# Altium PCB BLDC-Board.PcbDoc (part 7 of 7)
Units mm, origin at the board's own origin, x right, y up, seen from the top; angles counter-clockwise.
Board outline 150 x 117 mm, 4 copper layers (Top Layer, Layer 1, Layer 2, Bottom Layer), stack 1.566 mm thick; 307 components, 221 nets, 983 pads, 534 vias.
Unrouted connection lines stored in the file: 337.
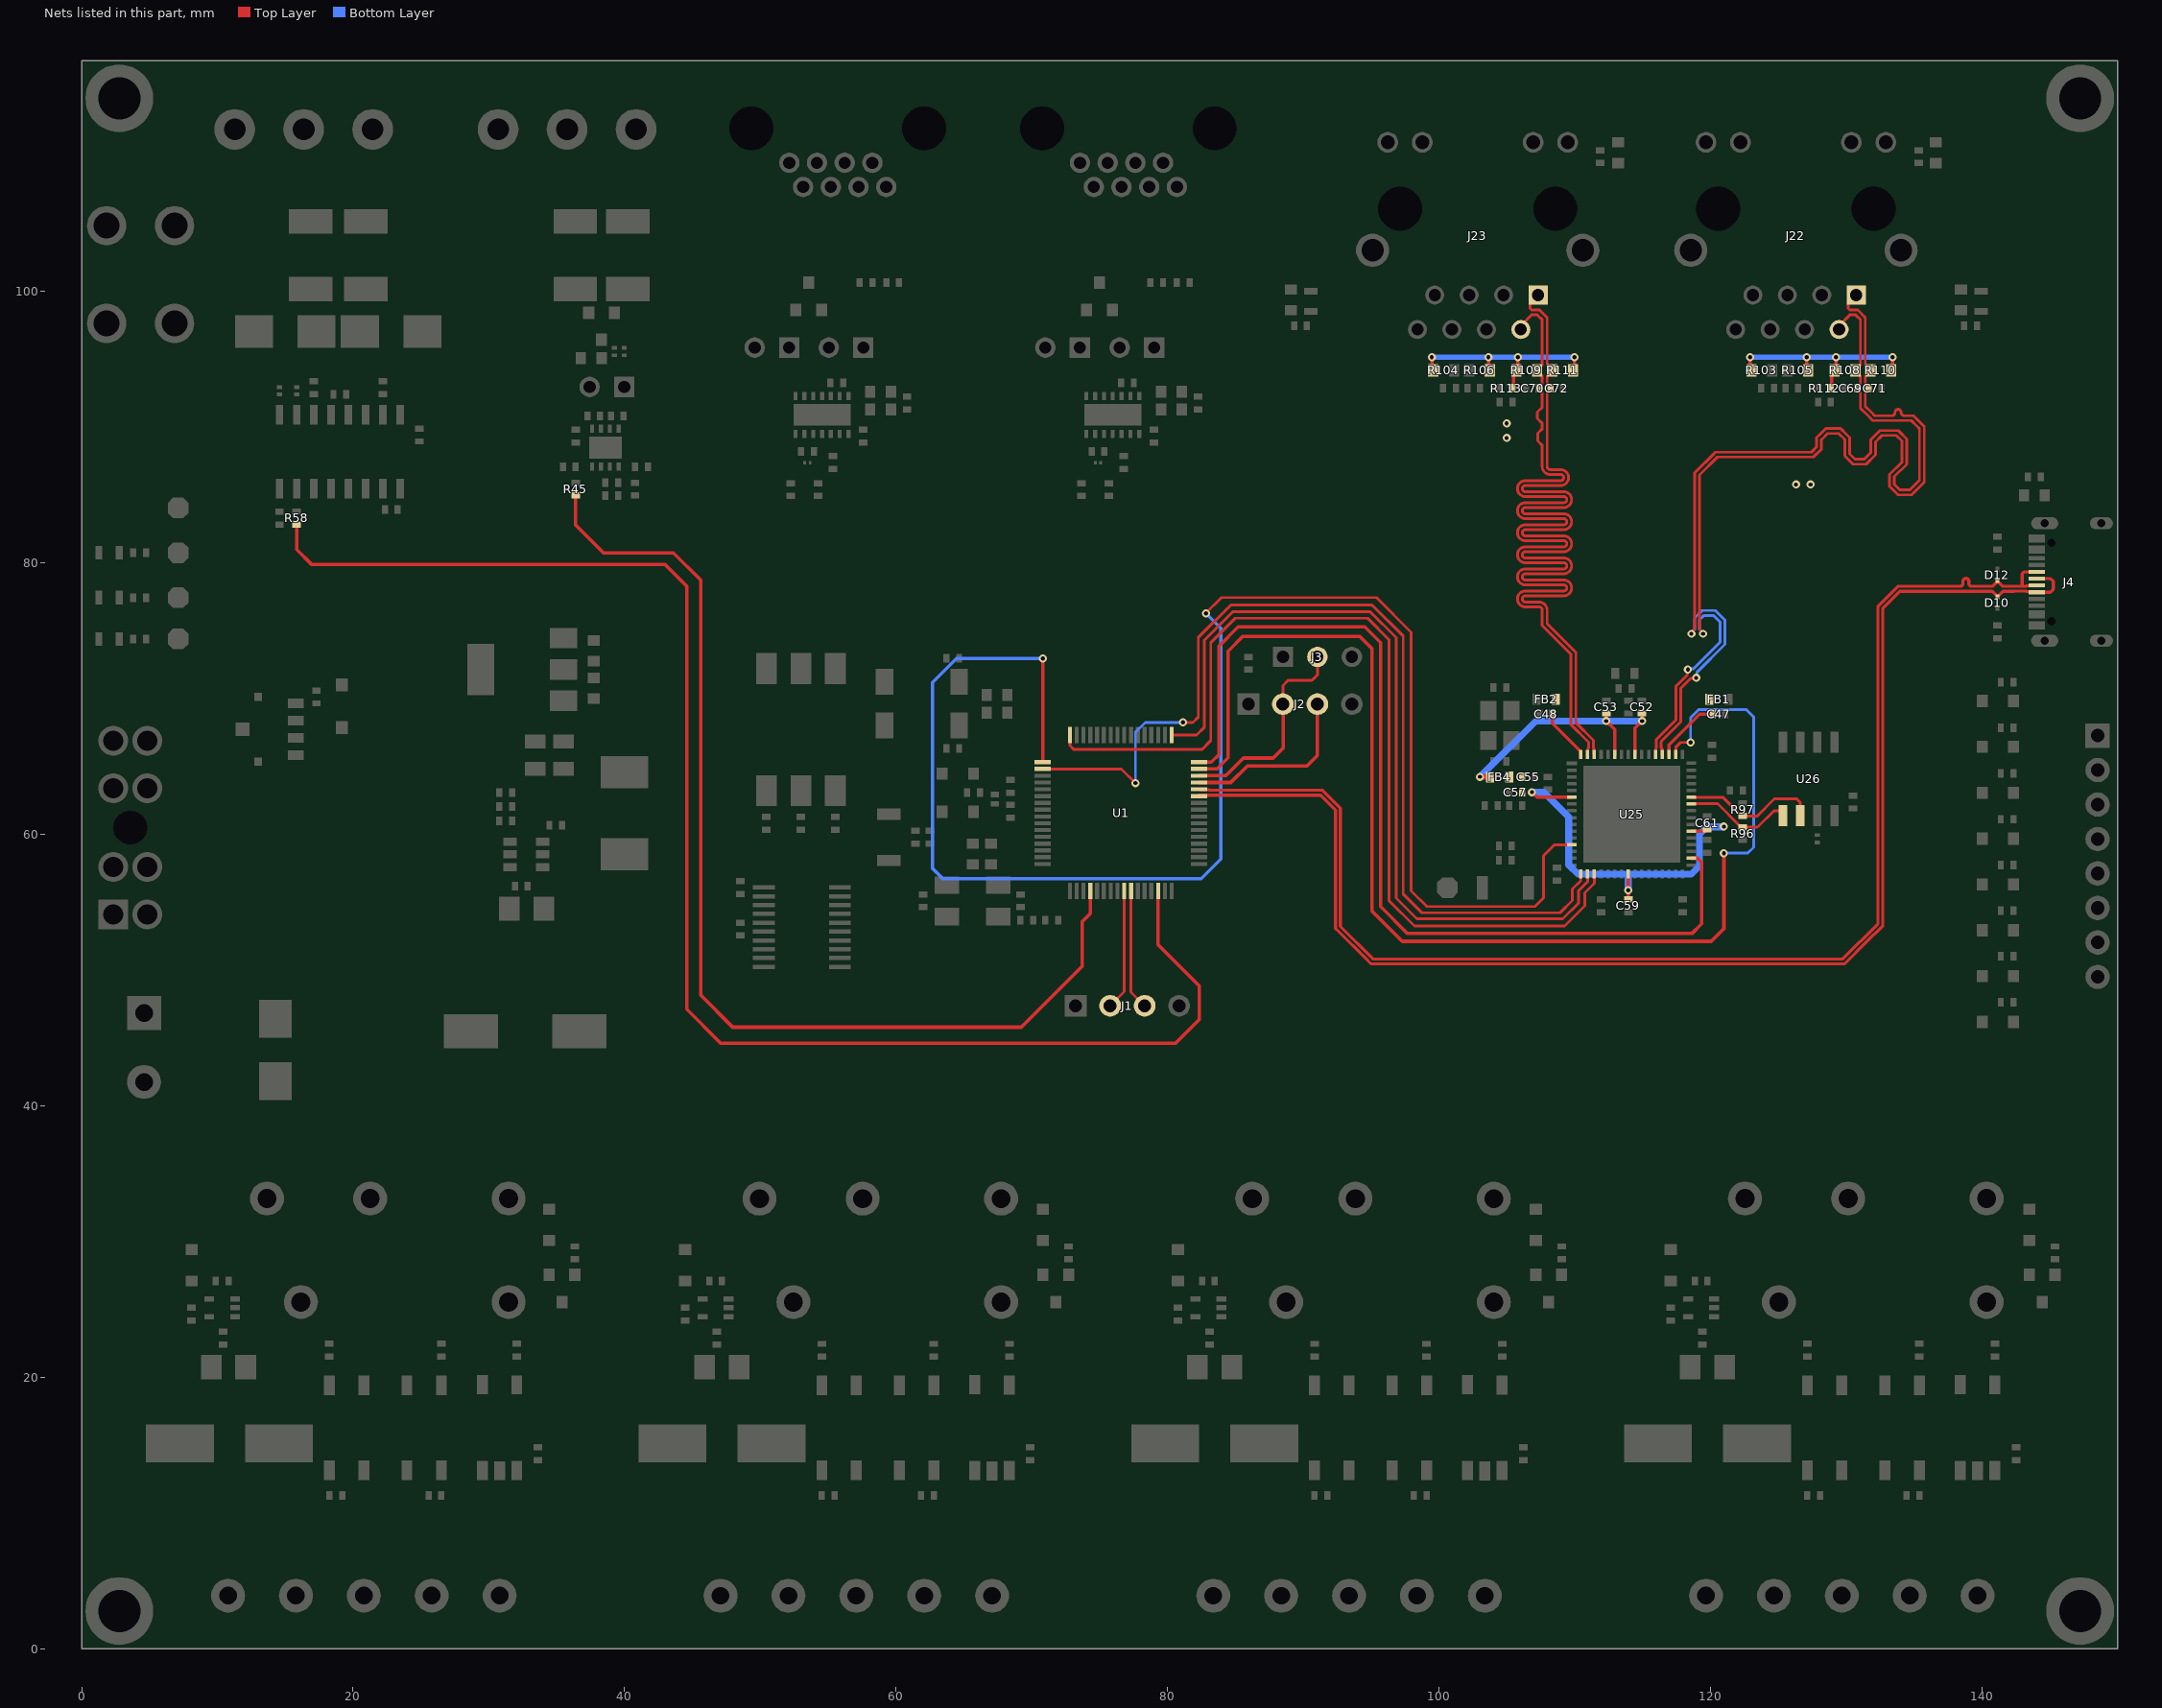
[diagram p6: the nets of this part, all layers, seen from the top]

## Via types
v1: diameter 0.6, hole 0.3, Top Layer to Bottom Layer, 534 vias

## Nets (pads, with @x,y where several pads share a name; then routed paths per layer and width w, separated by ;. In a path a pad name is that pad's centre, name@x,y a point inside that pad or via, vN(x,y) a via of type N, cw(c..) or ccw(c..) an arc to the next point about the centre after c; other vN are vias at no path point) (continued)
SCL: R97.1 U25.43 U26.6 | length 10.2
  Top Layer w0.203: U25.43@118.585,62.731 120.895,62.731 122.147,61.478 122.238,61.478 R97.1@122.365,61.351 123.452,61.351 124.703,62.602 126.341,62.602 126.594,62.35 U26.6@126.594,61.378
SDA: R96.1 U25.42 U26.5 | length 8.3
  Top Layer w0.203: U25.42@118.585,62.231 118.606,62.252 120.522,62.252 122.121,60.652 122.238,60.652 R96.1@122.365,60.525 ; R96.1@122.276,60.525 123.457,60.525 124.671,61.739 125.115,61.739 125.324,61.531 U26.5@125.324,61.378
SPI3_CS: U1.47 U25.50 | length 94.6
  Top Layer w0.203: U25.50@117.435,65.881 117.435,66.417 117.784,66.766 v1(118.528,66.766)
  Top Layer w0.254: U1.47@82.306,64.813 83.635,64.813 84.451,65.629 84.451,73.49 85.551,74.59 94.129,74.59 95.048,73.671 95.048,54.347 97.279,52.117 120.047,52.117 120.98,53.05 v1(120.98,58.606)
  Bottom Layer w0.203: v1(118.528,66.766) 118.528,68.586 119.125,69.183 122.623,69.183 123.165,68.641 123.165,59.052 122.718,58.606 v1(120.98,58.606)
SPI3_MISO: U1.1 U25.13 | length 122.6
  Top Layer w0.203: v1(82.819,76.281) 83.973,77.435 95.39,77.435 97.943,74.882 97.943,55.83 99.093,54.68 107.063,54.68 107.696,55.312 107.696,58.419 108.508,59.231 U25.13@109.785,59.231
  Top Layer w0.254: U1.1@70.815,65.323 v1(70.815,72.942)
  Bottom Layer w0.254: v1(70.815,72.942) 64.44,72.942 62.687,71.189 62.687,57.486 63.436,56.737 82.474,56.737 83.922,58.185 83.922,75.179 v1(82.819,76.281)
SPI3_MOSI: U1.2 U25.17 | length 73.6
  Top Layer w0.203: U1.2@70.806,64.813 76.59,64.813 v1(77.63,63.773) ; v1(81.128,68.243) 81.866,68.243 82.26,68.637 82.26,74.5 84.663,76.903 95.062,76.903 97.353,74.611 97.353,55.595 98.732,54.217 108.908,54.217 109.809,55.118 109.809,55.957 110.429,56.578 110.429,57.075 U25.17@110.435,57.081
  Bottom Layer w0.203: v1(77.63,63.773) 77.63,67.515 78.359,68.243 v1(81.128,68.243)
SPI3_SCK: U1.64 U25.19 | length 71
  Top Layer w0.203: U1.64@72.806,67.313 72.806,66.537 73.102,66.241 82.517,66.241 83.185,66.909 83.185,74.117 84.986,75.917 94.739,75.917 96.321,74.335 96.321,55.099 98.179,53.241 109.239,53.241 110.734,54.735 110.734,55.689 111.435,56.39 U25.19@111.435,57.081
SW_CLK/BOOT0: J2.2 J3.2 U1.46 | length 15.9
  Top Layer w0.203: J2.2@88.494,69.589 88.494,70.961 88.875,71.342 90.634,71.342 91.034,71.742 J3.2@91.034,73.069
  Top Layer w0.254: U1.46@82.306,64.313 84.282,64.313 85.583,65.614 87.777,65.614 88.519,66.357 88.519,69.564 J2.2@88.494,69.589
SW_DIO: J2.3 U1.45 | length 13.3
  Top Layer w0.254: U1.45@82.306,63.813 84.653,63.813 85.86,65.019 90.253,65.019 91.034,65.8 J2.3@91.034,69.589
SYNC0: U1.48 U25.34 | length 72.3
  Top Layer w0.254: U1.48@82.306,65.313 83.227,65.313 83.795,65.881 83.795,73.88 85.2,75.285 94.523,75.285 95.687,74.121 95.687,54.671 97.674,52.685 118.621,52.685 119.343,53.406 119.343,57.93 119.041,58.231 U25.34@118.585,58.231
SYNC1: U1.49 U25.18 | length 61
  Top Layer w0.203: U1.49@80.306,67.313 82.127,67.313 82.717,67.902 82.717,74.311 84.804,76.398 94.92,76.398 96.84,74.479 96.84,55.292 98.364,53.767 109.104,53.767 110.265,54.929 110.265,55.844 110.935,56.513 U25.18@110.935,57.081
TXA_N: C69.2 J22.2 R108.1 U25.52 | length 72.9
  Top Layer w0.203: U25.52@116.435,65.881 116.412,65.904 116.412,66.31 116.363,66.359 116.363,66.831 117.813,68.281 117.813,70.758 118.531,71.476 118.883,71.476 v1(118.935,71.528) ; v1(118.583,74.771) 118.583,74.878 118.833,75.128 118.833,86.628 119.041,86.836 120.146,87.942 120.354,88.15 127.431,88.15 127.815,88.534 127.815,89.225 128.041,89.451 128.477,89.887 129.584,89.887 130.026,89.445 130.234,89.237 130.234,88.018 130.627,87.625 131.318,87.625 131.801,88.108 131.801,89.066 132.478,89.743 133.828,89.743 133.932,89.639 134.442,89.129 134.442,87.258 133.539,86.356 133.539,85.783 133.96,85.363 134.666,85.363 135.385,86.082 135.385,89.883 135.194,90.075 134.789,90.48 131.944,90.48 131.613,90.811 131.039,91.385 131.039,92.526 130.797,92.767 C69.2@130.797,92.856 130.797,92.945 131.039,93.186 131.039,93.732 130.658,94.113 R108.1@130.658,94.177 130.658,94.24 131.039,94.621 131.039,97.911 130.686,98.264 130.256,98.264 129.464,97.473 J22.2@129.464,97.188
  Bottom Layer w0.203: v1(118.583,74.771) 118.583,74.844 118.833,75.093 118.833,75.941 119.041,76.149 119.166,76.274 119.374,76.482 120.354,76.482 120.562,76.274 120.848,75.988 121.056,75.78 121.056,74.001 118.987,71.932 118.987,71.579 v1(118.935,71.528)
TXA_P: C71.2 J22.1 R110.1 U25.53 | length 72.9
  Top Layer w0.203: U25.53@115.935,65.881 115.958,65.904 115.958,66.31 116.007,66.359 116.007,66.978 117.457,68.428 117.457,70.905 118.279,71.727 118.279,72.08 v1(118.331,72.132) ; v1(119.437,74.771) 119.437,74.878 119.188,75.128 119.188,86.481 120.502,87.794 127.578,87.794 128.171,88.387 128.171,89.078 128.188,89.095 128.624,89.531 129.437,89.531 129.879,89.09 129.879,87.871 130.48,87.27 131.465,87.27 132.156,87.96 132.156,88.919 132.625,89.388 133.68,89.388 134.086,88.982 134.086,87.405 133.183,86.503 133.183,85.636 133.812,85.007 134.813,85.007 135.741,85.935 135.741,90.031 134.936,90.835 134.825,90.835 134.266,90.835 cw(c134.266,91.064) 134.038,91.064 134.038,91.073 ccw(c133.809,91.073) 133.58,91.073 133.58,91.064 cw(c133.352,91.064) 133.352,90.835 132.812,90.835 132.092,90.835 131.864,91.063 131.394,91.532 131.394,92.526 131.636,92.767 C71.2@131.636,92.856 131.636,92.945 131.394,93.186 131.394,93.732 131.775,94.113 R110.1@131.775,94.177 131.775,94.24 131.394,94.621 131.394,98.059 130.833,98.62 130.256,98.62 130.137,98.739 130.137,99.13 J22.1@130.734,99.728
  Bottom Layer w0.203: v1(118.331,72.132) 118.383,72.183 118.735,72.183 120.701,74.149 120.701,75.633 120.207,76.127 119.522,76.127 119.188,75.793 119.188,75.093 119.437,74.844 v1(119.437,74.771)
TXB_N: C70.2 J23.2 R109.1 U25.63 | length 75.6
  Top Layer w0.203: J23.2@106.025,97.188 106.025,97.473 106.816,98.264 107.244,98.264 107.599,97.909 107.599,94.621 107.218,94.24 R109.1@107.218,94.177 107.218,94.113 107.599,93.732 107.599,93.186 107.358,92.945 C70.2@107.358,92.856 107.358,92.767 107.599,92.526 107.599,91.462 107.226,91.09 107.226,90.646 107.599,90.274 107.599,89.885 107.26,89.546 107.26,88.985 107.599,88.646 107.599,88.316 107.599,87.09 ccw(c108.183,87.09) 108.183,86.506 108.954,86.506 cw(c108.954,86.278) 108.954,86.049 106.355,86.049 ccw(c106.355,85.465) 106.355,84.881 109.182,84.881 cw(c109.182,84.652) 109.182,84.423 106.355,84.423 ccw(c106.355,83.839) 106.355,83.255 109.182,83.255 cw(c109.182,83.026) 109.182,82.798 106.355,82.798 ccw(c106.355,82.214) 106.355,81.629 109.182,81.629 cw(c109.182,81.401) 109.182,81.172 106.355,81.172 ccw(c106.355,80.588) 106.355,80.004 109.182,80.004 cw(c109.182,79.775) 109.182,79.547 106.355,79.547 ccw(c106.355,78.962) 106.355,78.378 109.182,78.378 cw(c109.182,78.15) 109.182,77.921 106.355,77.921 ccw(c106.355,77.337) 106.355,76.753 107.37,76.753 cw(c107.37,76.524) 107.599,76.524 107.599,76.245 107.599,75.373 109.721,73.251 109.721,68.07 111.007,66.783 111.007,66.359 110.958,66.31 110.958,65.904 U25.63@110.935,65.881
TXB_P: C72.2 J23.1 R111.1 U25.62 | length 75.6
  Top Layer w0.203: J23.1@107.295,99.728 106.697,99.13 106.697,98.739 106.816,98.62 107.391,98.62 107.954,98.057 107.954,94.621 108.335,94.24 R111.1@108.335,94.177 108.335,94.113 107.954,93.732 107.954,93.186 108.196,92.945 C72.2@108.196,92.856 108.196,92.767 107.954,92.526 107.954,88.316 107.954,87.09 ccw(c108.183,87.09) 108.183,86.862 108.954,86.862 cw(c108.954,86.278) 108.954,85.693 106.355,85.693 ccw(c106.355,85.465) 106.355,85.236 109.182,85.236 cw(c109.182,84.652) 109.182,84.068 106.355,84.068 ccw(c106.355,83.839) 106.355,83.611 109.182,83.611 cw(c109.182,83.026) 109.182,82.442 106.355,82.442 ccw(c106.355,82.214) 106.355,81.985 109.182,81.985 cw(c109.182,81.401) 109.182,80.817 106.355,80.817 ccw(c106.355,80.588) 106.355,80.359 109.182,80.359 cw(c109.182,79.775) 109.182,79.191 106.355,79.191 ccw(c106.355,78.962) 106.355,78.734 109.182,78.734 cw(c109.182,78.15) 109.182,77.565 106.355,77.565 ccw(c106.355,77.337) 106.355,77.108 107.37,77.108 cw(c107.37,76.524) 107.954,76.524 107.954,76.245 107.954,75.52 110.076,73.398 110.076,68.217 111.363,66.93 111.363,66.359 111.412,66.31 111.412,65.904 U25.62@111.435,65.881
TXD/RS232: R58.2 U1.30 | length 113.1
  Top Layer w0.254: R58.2@15.847,82.823 15.847,80.974 16.957,79.864 42.987,79.864 44.574,78.277 44.574,47.111 47.079,44.606 80.581,44.606 82.347,46.372 82.347,48.812 79.306,51.853 U1.30@79.306,55.813
TXD/RS485: R45.1 U1.20 | length 80.4
  Top Layer w0.254: R45.1@36.395,84.956 36.395,82.78 38.447,80.728 43.6,80.728 45.622,78.706 45.622,48.129 47.964,45.787 69.219,45.787 73.705,50.274 73.705,53.569 74.306,54.17 U1.20@74.306,55.813
USART1_RX: J1.3 U1.26 | length 8.9
  Top Layer w0.203: U1.26@77.306,55.813 77.306,48.367 J1.3@78.308,47.364
USART1_TX: J1.2 U1.25 | length 8.9
  Top Layer w0.203: J1.2@75.768,47.364 76.806,48.402 U1.25@76.806,55.813
USB_N: D10.1 J4.A7 J4.B7 U1.43 | length 100.6
  Top Layer w0.229: U1.43@82.306,62.871 83.098,62.871 83.113,62.885 91.277,62.885 92.376,61.787 92.376,53.065 92.584,52.857 94.63,50.81 94.88,50.561 94.984,50.456 129.878,50.456 129.983,50.561 131.405,51.983 132.689,53.267 132.689,76.659 133.937,77.907 139.743,77.907 140.748,77.907 141.102,77.553 141.102,77.508 D10.1@141.122,77.487 ; D10.1@141.122,77.532 141.143,77.553 141.188,77.553 141.542,77.907 142.355,77.907 142.356,77.909 143.233,77.909 143.27,77.872 144.005,77.872 J4.B7@144.04,77.837 145.025,77.837 145.241,78.052 145.241,78.632 145.037,78.837 J4.A7@144.04,78.837
USB_P: D12.1 J4.A6 J4.B6 U1.44 | length 100.4
  Top Layer w0.229: U1.44@82.306,63.319 82.347,63.277 83.076,63.277 83.113,63.241 91.425,63.241 92.731,61.934 92.731,53.212 95.132,50.812 129.731,50.812 132.333,53.414 132.333,76.807 133.789,78.263 138.249,78.263 138.363,78.263 ccw(c138.363,78.491) 138.592,78.491 138.592,78.638 cw(c138.808,78.638) 139.023,78.638 139.023,78.491 ccw(c139.252,78.491) 139.252,78.263 139.891,78.263 140.282,78.263 140.748,78.263 141.102,78.617 141.102,78.662 D12.1@141.122,78.683 ; D12.1@141.122,78.638 141.143,78.617 141.188,78.617 141.542,78.263 142.207,78.263 142.209,78.264 142.943,78.264 ; J4.A6@144.04,78.337 144.005,78.301 143.27,78.301 143.233,78.264 142.943,78.264 ; J4.B6@144.04,79.337 143.104,79.337 142.943,79.175 142.943,78.264
VDD12TX1: C52.2 C53.2 FB4.2 U25.56 U25.59 | length 20.9
  Top Layer w0.254: C53.2@112.314,68.904 v1(112.314,68.343) 112.935,67.722 U25.59@112.935,65.881 ; U25.56@114.435,65.881 114.435,67.825 v1(114.952,68.343) C52.2@114.952,68.904
  Top Layer w0.381: v1(103.016,64.231) FB4.2@103.769,64.231
  Bottom Layer w0.508: v1(103.016,64.231) 107.128,68.343 v1(112.314,68.343) v1(114.952,68.343)
VDD33TXRX1: C47.2 FB1.2 R103.2 R105.2 R108.2 R110.2 R112.2 U25.51 | length 20.8
  Top Layer w0.254: U25.51@116.935,65.881 116.935,66.581 119.207,68.853 C47.2@120.138,68.853 ; v1(122.906,95.142) 122.906,94.283 R103.2@123.012,94.177 ; v1(127.072,95.142) 127.072,94.283 R105.2@127.178,94.177 ; R112.2@128.854,92.856 128.92,92.921 128.92,93.963 129.24,94.283 v1(129.24,95.142) ; R110.2@133.299,94.177 133.406,94.283 v1(133.406,95.142)
  Bottom Layer w0.381: v1(122.906,95.142) v1(127.072,95.142) v1(129.24,95.142) v1(133.406,95.142)
  other v1: 126.289,85.769 127.356,85.769
VDD33TXRX2: C48.2 FB2.2 R104.2 R106.2 R109.2 R111.2 R113.2 U25.64 | length 20.1
  Top Layer w0.254: v1(99.466,95.142) 99.466,94.283 R104.2@99.572,94.177 ; v1(103.632,95.142) 103.632,94.283 R106.2@103.739,94.177 ; R113.2@105.414,92.856 105.476,92.918 105.476,93.959 105.8,94.283 v1(105.8,95.142) ; C48.2@108.348,69.107 108.348,68.189 110.435,66.102 U25.64@110.435,65.881 ; R111.2@109.859,94.177 109.966,94.283 v1(109.966,95.142)
  Bottom Layer w0.381: v1(99.466,95.142) v1(103.632,95.142) v1(105.8,95.142) v1(109.966,95.142)
  other v1: 104.978,89.198 104.978,90.265
VDDCR: C55.2 C57.2 C59.2 C61.2 FB4.1 U25.6 U25.24 U25.38 | length 28.9
  Top Layer w0.254: v1(106.839,63.106) 107.214,62.731 U25.6@109.785,62.731 ; C59.2@113.935,55.204 v1(113.935,55.886) U25.24@113.935,57.081 ; U25.38@118.585,60.231 119.518,60.231 119.659,60.373 C61.2@119.748,60.373
  Bottom Layer w0.508: v1(106.839,63.106) 107.712,63.106 109.55,61.268 109.55,57.753 110.236,57.067 113.935,57.067 ; v1(113.935,55.886) 113.935,57.067 ; v1(120.98,60.567) 120.963,60.55 119.734,60.55 119.18,59.996 119.18,57.659 118.588,57.067 113.935,57.067
pads on no net: J4.A4/B9 J4.A8 J4.B4/A9 J4.B8 J4.MH J7. J12. J12.1 J12.2 J12.3 J12.6 J13. J13.1 J13.2 J13.3 J13.6 J22.7 J22.11 J22.12 J22.MH1 J22.MH2 J23.7 J23.11 J23.12 J23.MH1 J23.MH2 K1.5 K2.5 K3.5 K4.5 U2.3 U2.8 U2.13 U2.18 U8.11 U8.12 U8.13 U8.14 U25.3 U25.12 U25.15 U25.16 U25.21 U25.22 U25.23 U25.25 U25.26 U25.27 U25.28 U25.29 U25.30 U25.31 U25.33 U25.35 U25.36 U25.39 U25.40 U25.49

## Polygon pours and split planes (outlines as drawn)
+24V on Top Layer "+24V_L01_P016" (solid, pour order 16): 26.492,58.852 26.492,68.727 17.094,68.727 17.094,31.337 35.154,31.337 35.154,38.068 32.258,38.068 32.258,58.852
GND on Top Layer "GND_L01_P035" (solid, pour order 35): 146.412,10.719 146.412,27.814 143.759,30.467 117.205,30.467 115.771,29.034 115.771,19.903 117.151,18.523 119.748,18.523 119.748,22.638 127.317,22.638 127.317,16.776 127.317,10.719
GND on Top Layer "GND_L01_P034" (solid, pour order 34): 110.111,10.77 110.111,27.806 107.459,30.459 80.904,30.459 79.471,29.026 79.471,19.894 80.851,18.515 83.448,18.515 83.448,22.629 91.017,22.629 91.017,16.767 91.017,10.77
GND on Top Layer "GND_L01_P033" (solid, pour order 33): 73.815,10.719 73.815,27.806 71.162,30.459 44.608,30.459 43.174,29.026 43.174,19.894 44.554,18.515 47.151,18.515 47.151,22.629 54.72,22.629 54.72,16.767 54.72,10.719
GND on Top Layer "GND_L01_P032" (solid, pour order 32): 37.535,10.719 37.535,27.814 34.882,30.467 8.328,30.467 6.894,29.034 6.894,19.903 8.274,18.523 10.871,18.523 10.871,22.638 18.44,22.638 18.44,16.776 18.44,10.719
GND on Top Layer "GND_L01_P029" (solid, remove dead copper, pour order 29): 0,36.341 0,117 150,117 150,36.341
MOTOR4_PLUS on Top Layer "MOTOR4_PLUS_L01_P025" (solid, pour order 25): 118.617,16.54 118.617,12.046 121.882,8.782 121.882,1.848 117.233,1.848 117.233,8.426 111.849,13.811 111.849,31.76 114.728,34.639 124.295,34.639 124.295,31.566 116.903,31.566 115.405,30.067 115.405,19.752
MOTOR3_PLUS on Top Layer "MOTOR3_PLUS_L01_P024" (solid, pour order 24): 82.317,16.532 82.317,12.038 85.581,8.774 85.581,1.84 80.933,1.84 80.933,8.418 75.548,13.803 75.548,31.752 78.427,34.631 87.994,34.631 87.994,31.558 80.603,31.558 79.104,30.059 79.104,19.744
MOTOR1_PLUS on Top Layer "MOTOR1_PLUS_L01_P023" (solid, pour order 23): 9.74,16.54 9.74,12.046 13.005,8.782 13.005,1.848 8.357,1.848 8.357,8.426 2.972,13.811 2.972,31.76 5.851,34.639 15.418,34.639 15.418,31.566 8.026,31.566 6.528,30.067 6.528,19.752
MOTOR2_PLUS on Top Layer "MOTOR2_PLUS_L01_P022" (solid, pour order 22): 46.02,16.532 46.02,12.038 49.285,8.774 49.285,1.84 44.636,1.84 44.636,8.418 39.252,13.803 39.252,31.752 42.131,34.631 51.698,34.631 51.698,31.558 44.306,31.558 42.808,30.059 42.808,19.744
MOTOR3_GND on Top Layer "MOTOR3_GND_L01_P021" (solid, pour order 21): 83.898,12.108 86.369,9.637 86.369,1.84 90.179,1.84 90.179,9.409 89.617,9.971 89.617,16.532 87.883,18.265 87.883,21.626 83.898,21.626
MOTOR2_GND on Top Layer "MOTOR2_GND_L01_P019" (solid, pour order 19): 47.602,12.108 50.072,9.637 50.072,1.84 53.882,1.84 53.882,9.409 53.32,9.971 53.32,16.532 51.586,18.265 51.586,21.626 47.602,21.626
+24V on Top Layer "+24V_L01_P017" (solid, pour order 17): 29.642,41.573 39.573,41.573 144.221,41.573 144.221,31.439 126.594,31.439 126.594,35.839 108.052,35.839 108.052,31.439 90.627,31.439 90.627,35.839 71.907,35.839 71.907,31.362 54.204,31.362 54.204,35.839 41.79,35.839 37.287,31.337 29.642,31.337
MOTOR4_GND on Top Layer "MOTOR4_GND_L01_P012" (solid, pour order 12): 120.199,12.116 122.669,9.645 122.669,1.848 126.479,1.848 126.479,9.417 125.917,9.979 125.917,16.54 124.183,18.273 124.183,21.634 120.199,21.634
MOTOR1_GND on Top Layer "MOTOR1_GND_L01_P009" (solid, pour order 9): 11.322,12.116 13.792,9.645 13.792,1.848 17.602,1.848 17.602,9.417 17.04,9.979 17.04,16.54 15.307,18.273 15.307,21.634 11.322,21.634
VDD33TXRX1 on Top Layer "VDD33TXRX1_L01_P003" (solid, pour order 3): 119.608,68.536 119.608,70.998 120.726,72.115 120.726,84.499 122.657,86.43 127.94,86.43 127.94,85.134 123.241,85.134 121.92,83.813 121.92,71.895 120.367,70.342 120.367,68.536
VDD33TXRX2 on Top Layer "VDD33TXRX2_L01_P002" (solid, pour order 2): 105.643,90.722 105.643,88.517 104.013,86.887 104.013,76.272 108.878,71.407 108.878,68.536 108.119,68.536 108.119,70.665 102.489,76.295 102.489,90.722
NetC16_1 on Top Layer "NETC16_1_L01_P001" (solid, pour order 1): 34.605,58.825 34.93,58.825 37.103,60.998 42.901,60.998 42.901,56.813 37.135,56.813 35.743,58.205 33.466,58.205 33.466,58.825
GND on Layer 1 "GND_L02_P031" (solid, pour order 31): 0,0 0,117 150,117 150,0
"CHASIS GND" on Layer 1 "CHASIS_GND_L02_P015" (solid, pour order 15): 116.865,95.98 123.393,95.98 123.393,101.162 141.326,101.162 141.326,9.95 0,9.95 0,0 150,0 150,117 0,117 0,105.816 92.939,105.816 92.939,95.98 112.624,95.98
+3V3 on Layer 2 "+3V3_L03_P028" (solid, pour order 28): 0,0 0,117 150,117 150,0
+5V on Layer 2 "+5V_L03_P027" (solid, pour order 27): 54.94,92.405 71.711,92.405 72.727,91.389 79.451,91.389 79.451,87.446 51.892,87.446 51.892,72.51 38.252,72.51 38.252,63.468 59.353,63.468 70.199,74.314 137.312,74.314 137.312,14.046 32.715,14.046 32.715,0 150,0 150,86.861 89.662,86.861 81.839,94.685 54.94,94.685
+24V on Layer 2 "+24V_L03_P008" (solid, pour order 8): 26.162,49.454 26.162,44.926 108.052,44.926 108.052,28.772 17.704,28.772 17.704,49.454
GND on Bottom Layer "GND_L04_P030" (solid, remove dead copper, pour order 30): 0,0 0,117 150,117 150,0

## Other copper
Top Layer:
  rectangle net GND: 2.622,40.022 8.718,43.899
  rectangle net +24V: 136.557,31.449 144.167,35.445
  rectangle net +24V: 126.853,31.481 134.463,35.476
  rectangle net +24V: 99.242,31.59 106.852,35.585
  rectangle net +24V: 91.21,31.59 98.82,35.585
  rectangle net +24V: 63.921,31.59 71.531,35.585
  rectangle net +24V: 54.644,31.59 62.254,35.585
  rectangle net +24V: 28.564,31.598 36.174,35.593
  rectangle net +24V: 18.364,31.598 25.974,35.593
  rectangle net NetJ7_3: 0.533,62.052 14.224,72.339
  rectangle net NetD13_2: 0.457,44.628 16.576,49.225
  rectangle net NetD29_1: 18.727,69.297 19.627,71.494
  rectangle net NetD29_1: 14.91,69.297 19.627,69.997
  rectangle net NetD13_2: 0.457,44.628 13.513,58.947
  rectangle net +24V: 14.884,50.368 25.857,68.727
  rectangle net GND: 71.605,60.161 72.439,61.463
  rectangle net GND: 67.844,61.163 72.439,61.463
  rectangle net MOTOR1_PLUS: 8.37,1.848 13.005,6.629
  rectangle net MOTOR2_PLUS: 44.649,1.84 49.285,6.621
  rectangle net MOTOR3_PLUS: 80.946,1.84 85.581,6.621
  rectangle net MOTOR4_PLUS: 117.246,1.848 121.882,6.629
  rectangle net GND: 32.584,27.086 34.842,29.032
  rectangle net GND: 105.279,27.078 107.537,29.024
  rectangle net GND: 68.957,27.078 71.215,29.024
  rectangle net GND: 138.111,15.988 143.862,17.577
  rectangle net GND: 141.395,14.509 143.862,17.577
  rectangle net GND: 32.496,14.509 34.963,15.583
  rectangle net GND: 68.747,14.501 71.214,15.575
  rectangle net GND: 105.094,14.501 107.561,15.575
  rectangle net GND: 6.894,19.899 10.747,22.638
  rectangle net GND: 7.633,19.431 10.747,22.638
  rectangle net GND: 8.732,18.523 10.747,22.638
  rectangle net GND: 43.25,19.899 47.103,22.638
  rectangle net GND: 43.989,19.431 47.103,22.638
  rectangle net GND: 45.088,18.523 47.103,22.638
  rectangle net GND: 79.547,19.899 83.399,22.638
  rectangle net GND: 80.286,19.431 83.399,22.638
  rectangle net GND: 81.385,18.523 83.399,22.638
  rectangle net GND: 117.685,18.523 119.7,22.638
  rectangle net GND: 116.586,19.431 119.7,22.638
  rectangle net GND: 115.847,19.899 119.7,22.638
  rectangle net MOTOR4_GND: 122.669,1.848 126.479,6.35
  rectangle net MOTOR3_GND: 86.369,1.84 90.179,6.342
  rectangle net MOTOR2_GND: 50.072,1.84 53.882,6.342
  rectangle net MOTOR1_GND: 13.792,1.848 17.602,6.35
  rectangle net +3V3: 107.696,63.063 109.124,63.735
  rectangle net +3V3: 48.066,53.253 51.139,53.729
  rectangle net GND: 141.581,27.086 143.884,29.029
  rectangle net +3V3: 32.487,73.603 41.402,77.286
  rectangle net +5V: 52.79,86.379 54.163,86.986
  rectangle net +5V: 74.209,86.379 75.577,86.982
  rectangle net +3V3: 116.741,23.035 118.721,24.656
  rectangle net +3V3: 80.441,23.035 82.421,24.656
  rectangle net +3V3: 44.144,23.035 46.124,24.656
  rectangle net +3V3: 7.788,23.035 9.768,24.656
  rectangle net MOTOR4_PLUS: 118.989,31.566 124.295,34.639
  rectangle net MOTOR3_PLUS: 82.688,31.558 87.994,34.631
  rectangle net MOTOR2_PLUS: 46.392,31.558 51.698,34.631
  rectangle net MOTOR1_PLUS: 10.112,31.566 15.418,34.639
  rectangle net +3V3: 34.083,89.584 37.762,90.184
  rectangle net +3V3: 119.774,64.751 120.409,65.868
  rectangle net VDD33TXRX1: 119.608,68.536 120.367,70.342
  rectangle net VDD33TXRX2: 108.119,68.536 108.878,70.342
  rectangle net VDD33TXRX2: 110.211,65.531 110.56,66.309
  rectangle net +3V3: 105.88,61.789 106.849,62.536
  rectangle net VDDCR: 105.804,62.789 107.151,63.424
  rectangle net VDDCR: 105.804,62.789 106.337,64.631
  rectangle net VDDCR: 120.648,60.144 121.285,60.877
  rectangle net VDDCR: 119.431,60.144 121.285,60.601
  rectangle net RE/DE/RS485/T: 38.113,86.784 39.063,87.384
  rectangle net +5V: 76.458,91.997 76.758,93.58
  rectangle net +3V3: 48.066,53.253 48.994,55.84
  rectangle net +5V: 75.12,87.89 75.458,89.797
  rectangle net +5V: 74.979,86.379 75.577,88.525
  rectangle net +5V: 53.565,86.379 54.163,88.525
  rectangle net +5V: 53.706,87.89 54.044,89.797
  rectangle net +5V: 55.044,91.997 55.344,93.58
  rectangle net VDDCR: 104.869,63.831 106.337,64.631
  rectangle net +5V: 31.66,11.804 33.964,14.133
  rectangle net +5V: 67.94,11.796 70.244,14.125
  rectangle net +5V: 104.237,11.796 106.54,14.125
  rectangle net +5V: 140.537,11.804 142.841,14.133
  rectangle net +3V3: 70.206,61.663 72.441,61.963
  rectangle net +3V3: 71.718,61.663 72.441,62.963
  rectangle net NetC8_2: 65.297,61.934 68.745,62.463
  rectangle net +3V3: 65.938,62.663 68.745,63.29
  rectangle net +3V3: 65.938,62.663 67.589,65.227
  rectangle net +3V3: 65.297,64.013 67.585,65.218
  rectangle net NetC8_2: 65.297,61.213 67.585,62.463
  rectangle net NetC8_2: 68.11,61.934 68.745,62.463
  rectangle net +3V3: 68.11,62.663 68.745,63.29
  rectangle net NetC8_2: 65.297,62.163 71.406,62.463
  rectangle net +3V3: 65.938,62.663 72.441,62.963
  rectangle net +3V3: 128.824,59.556 130.797,62.163
  rectangle net +3V3: 23.051,83.61 25.298,86.707
  rectangle net +5V: 32.639,66.338 42.901,70.593
  rectangle net +5V: 36.737,63.397 42.901,70.593
  region net "CHASIS GND": 0.055,1.323 0.055,4.63 cw(c0.182,4.63) 0.125,4.744 cw(c0.236,4.688) 0.136,4.763 cw(c2.824,2.754) 6.178,2.754 cw(c2.824,2.754) 4.853,0.083 cw(c4.776,0.184) 4.776,0.057 0.055,0.057
  region net "CHASIS GND": 149.945,1.323 149.945,4.63 ccw(c149.818,4.63) 149.875,4.744 ccw(c149.764,4.688) 149.864,4.763 ccw(c147.176,2.754) 143.822,2.754 ccw(c147.176,2.754) 145.147,0.083 ccw(c145.224,0.184) 145.224,0.057 149.945,0.057
  region net "CHASIS GND": 0.055,115.677 0.055,112.37 ccw(c0.182,112.37) 0.125,112.256 ccw(c0.236,112.312) 0.137,112.237 ccw(c2.824,114.246) 6.178,114.246 ccw(c2.824,114.246) 4.854,116.917 ccw(c4.777,116.816) 4.776,116.943 0.055,116.943
  region net "CHASIS GND": 149.945,115.677 149.945,112.37 cw(c149.818,112.37) 149.875,112.256 cw(c149.764,112.312) 149.864,112.237 cw(c147.176,114.246) 143.822,114.246 cw(c147.176,114.246) 145.147,116.917 cw(c145.224,116.816) 145.224,116.943 149.945,116.943
  pour cut-out: 36.638,61.44 36.638,62.982 43.841,62.982 43.841,61.44
  pour cut-out: 43.79,65.24 43.79,57.823 42.985,57.823 42.985,65.24
  pour cut-out: 15.733,44.38 17.078,44.38 17.078,44.995 16.348,44.995
  pour cut-out: 111.633,74.346 111.633,77.209 120.208,77.209 120.208,74.346
  pour cut-out: 134.264,49.193 134.264,78.638 131.056,78.638 131.056,49.193
  pour cut-out: 105.544,52.775 105.544,49.193 135.306,49.193 135.306,52.775
  pour cut-out: 84.653,62.201 84.653,64.631 94.66,64.631 94.66,62.201
  pour cut-out: 134.284,117 134.284,91.078 94.847,91.078 94.847,117
Layer 1:
  rectangle net "CHASIS GND": 0.393,95.497 9.169,107.308
  pour cut-out: 0,44.519 7.976,44.519 7.976,72.339 0,72.339 0,44.424
  pour cut-out: 0,72.339 10.211,72.339 10.211,62.046 0,62.046
Layer 2:
  rectangle net +24V: 18.677,31.214 23.176,37.052
  rectangle net +24V: 101.454,30.936 105.952,36.774
  rectangle net +24V: 91.254,30.936 95.752,36.774
  rectangle net +24V: 65.157,30.936 69.655,36.774
  rectangle net +24V: 54.957,30.936 59.455,36.774
  rectangle net +24V: 28.877,30.944 33.376,36.782
  pour cut-out: 94.856,117 94.856,95.611 94.844,95.599 134.29,95.599 134.29,117 94.852,117
  pour cut-out: 0,44.519 7.976,44.519 7.976,72.339 0,72.339 0,44.424
Bottom Layer:
  rectangle net GND: 1.906,39.412 8.703,43.822
  rectangle net +24V: 15.089,45.802 24.483,71.603
  rectangle net NetJ7_3: 0.533,62.052 14.224,72.339
  rectangle net NetD13_2: 0.457,44.52 8.814,58.947
  rectangle net +24V: 18.737,45.802 24.483,48.455
  rectangle net +24V: 18.225,30.981 24.377,37.763
  rectangle net +24V: 54.505,30.973 60.55,35.291
  rectangle net +24V: 90.801,30.973 96.846,35.291
  rectangle net +24V: 127.102,30.981 133.147,35.299
  rectangle net +3V3: 32.487,73.603 41.402,77.286
  rectangle net +5V: 32.08,66.491 39.954,70.199
  rectangle net VDD33TXRX1: 127.356,85.083 128.803,95.701
  region net VDD33TXRX1: 125.552,86.531 125.552,85.083 128.803,85.083 128.803,86.531
  rectangle net VDD33TXRX1: 122.5,94.558 133.727,95.701
  rectangle net VDD33TXRX2: 99.06,94.558 110.287,95.701
  rectangle net VDD33TXRX2: 104.216,88.766 105.664,95.497
  pour cut-out: 94.856,117 94.856,95.611 94.844,95.599 134.29,95.599 134.29,117 94.852,117
  pour cut-out: 116.662,2.032 116.662,5.761 142.215,5.761 142.215,2.032
  pour cut-out: 80.362,2.024 80.362,5.753 105.914,5.753 105.914,2.024
  pour cut-out: 44.065,2.024 44.065,5.753 69.618,5.753 69.618,2.024
  pour cut-out: 7.785,2.032 7.785,5.761 33.338,5.761 33.338,2.032

## Silkscreen, mask and mechanical layers (free items; w line width, h text height)
Top Overlay:
  lines w0.127: 96.939,35.108 96.939,46.206 ; 120.155,60.055 121.517,60.055 121.517,57.203 ; 91.779,35.106 112.708,35.106 112.708,46.206 91.779,46.206 91.779,35.106
  text "RS-232" at 25.914,106.777 h1.52 r90
  text "RS-485" at 45.319,106.777 h1.52 r90
  text "CAN OUT" at 66.82,105.505 h1.52 r90
  text "CAN IN" at 88.232,105.505 h1.52 r90
  text "ETHERCAT OUT" at 94.506,105.505 h1.52 r90
  text "ETHERCAT IN" at 117.946,105.505 h1.52 r90
  text "CHASIS GND" at 0.152,94.16 h1.52
  text "GND" at 5.233,85.143 h1.52
  text "+3V3" at 0.266,81.508 h1.52
  text "+5V" at 0.266,78.206 h1.52
  text "+24V" at 0.266,75.158 h1.52
  text "PD9" at 143.41,66.518 h1.52
  text "GND" at 93.893,66.056 h1 r90
  text "+3V3" at 86.269,65.918 h1 r90
  text "PD8" at 143.409,63.978 h1.52
  text "PC7" at 143.409,61.433 h1.52
  text "SW-CLK/BOOT0" at 89.08,60.848 h1 r90
  text "SW-DIO" at 91.62,60.848 h1 r90
  text "PC6" at 143.402,58.892 h1.52
  text "PA8" at 143.409,56.358 h1.52
  text "WAIT-ACK" at 92.249,55.478 h1
  text "PB15" at 143.653,54.091 h1.52
  text "PB14" at 143.649,51.541 h1.52
  text "PB13" at 143.409,48.738 h1.52
  text "+24V" at 11.074,45.998 h1.52 r90
  text "M +ve" at 92.73,44.576 h1.14
  text "Motor +24V" at 98.373,44.574 h1.14
  text "GND" at 81.168,43.831 h1 r90
  text "+3V3" at 73.544,43.693 h1 r90
  text "M -ve" at 92.73,42.29 h1.14
  text "Motor GND" at 98.373,42.285 h1.14
  text "USART1-RX" at 78.628,40.68 h1 r90
  text "USART1-TX" at 76.354,40.411 h1 r90
  text "M-FG" at 92.73,40.253 h1.14
  text "Motor FEEDBACK" at 98.373,40.252 h1.14
  text "DIGITAL I/Os" at 148.997,39.668 h1.52 r90
  text "GND" at 11.072,39.56 h1.52 r90
  text "M-DIR" at 92.73,38.221 h1.14
  text "Motor DIRECTION" at 98.373,38.221 h1.14
  text "M-SPD" at 92.73,36.189 h1.14
  text "Motor SPEED REGULATION" at 98.373,36.189 h1.14
  text "M-SPD" at 28.676,8.655 h1.52
  text "M-SPD" at 64.956,8.647 h1.52
  text "M-SPD" at 101.253,8.647 h1.52
  text "M-SPD" at 137.553,8.655 h1.52
  text "M +ve" at 8.428,8.393 h1.52
  text "M -ve" at 13.428,8.393 h1.52
  text "M +ve" at 117.305,8.393 h1.52
  text "M -ve" at 122.305,8.393 h1.52
  text "M-FG" at 18.428,8.382 h1.52
  text "M-DIR" at 23.428,8.382 h1.52
  text "M +ve" at 44.708,8.385 h1.52
  text "M -ve" at 49.708,8.385 h1.52
  text "M-FG" at 54.708,8.374 h1.52
  text "M-DIR" at 59.708,8.374 h1.52
  text "M +ve" at 81.005,8.385 h1.52
  text "M -ve" at 86.005,8.385 h1.52
  text "M-FG" at 91.005,8.374 h1.52
  text "M-DIR" at 96.005,8.374 h1.52
  text "M-FG" at 127.305,8.382 h1.52
  text "M-DIR" at 132.305,8.382 h1.52
Bottom Overlay:
  text "REV-v1.0" at 146.143,92.847 h2 r270
  text "BLDC BOARD" at 146.143,8.828 h2 r270
Board Outline:
  the board outline again, w0.254
Fabrication:
  drawing of 295 lines, arcs and shapes, not listed
  text "Layer" at 170.624,125.552 h1.52
  text "Name" at 181.036,125.552 h1.52
  text "Material" at 204.652,125.552 h1.52
  text "Thickness" at 226.49,125.552 h1.52
  text "Constant" at 242.996,125.552 h1.52
  text "Board Layer Stack" at 257.47,125.552 h1.52
  text "Top Overlay" at 181.036,122.504 h1.52
  text "Top Solder" at 181.036,119.456 h1.52
  text "Solder Resist" at 204.652,119.456 h1.52
  text "0.020mm" at 226.49,119.456 h1.52
  text "3.5" at 242.996,119.456 h1.52
  text "1" at 170.624,116.408 h1.52
  text "Top Layer" at 181.036,116.408 h1.52
  text "0.035mm" at 226.49,116.408 h1.52
  text "Dielectric 2" at 181.036,113.36 h1.52
  text "PP-006" at 204.652,113.36 h1.52
  text "0.203mm" at 226.49,113.36 h1.52
  text "4.4" at 242.996,113.36 h1.52
  text "2" at 170.624,110.312 h1.52
  text "Layer 1" at 181.036,110.312 h1.52
  text "CF-004" at 204.652,110.312 h1.52
  text "0.030mm" at 226.49,110.312 h1.52
  text "Dielectric 1" at 181.036,107.264 h1.52
  text "FR-4" at 204.652,107.264 h1.52
  text "1.030mm" at 226.49,107.264 h1.52
  text "4.6" at 242.996,107.264 h1.52
  text "3" at 170.624,104.216 h1.52
  text "Layer 2" at 181.036,104.216 h1.52
  text "CF-004" at 204.652,104.216 h1.52
  text "0.030mm" at 226.49,104.216 h1.52
  text "Dielectric 3" at 181.036,101.168 h1.52
  text "PP-006" at 204.652,101.168 h1.52
  text "0.203mm" at 226.49,101.168 h1.52
  text "4.4" at 242.996,101.168 h1.52
  text "4" at 170.624,98.12 h1.52
  text "Bottom Layer" at 181.036,98.12 h1.52
  text "0.035mm" at 226.49,98.12 h1.52
  text "Bottom Solder" at 181.036,95.072 h1.52
  text "Solder Resist" at 204.652,95.072 h1.52
  text "0.020mm" at 226.49,95.072 h1.52
  text "3.5" at 242.996,95.072 h1.52
  text "Bottom Overlay" at 181.036,92.024 h1.52
  text "Total board thickness:" at 170.624,88.976 h1.52
  text "1.606mm" at 226.49,88.976 h1.52
Drill Drawing:
  drawing of 189 lines, arcs and shapes, not listed
  text "Symbol" at 2.578,219.632 h1.83
  text "Count" at 15.427,219.632 h1.83
  text "Hole Size" at 30.663,219.632 h1.83
  text "Plated" at 59.865,219.632 h1.83
  text "Hole Type" at 72.714,219.632 h1.83
  text "Drill Layer Pair" at 91.353,219.632 h1.83
  text "Via/Pad" at 129.441,219.632 h1.83
  text "Pad Shape" at 144.423,219.632 h1.83
  text "Template" at 163.367,219.632 h1.83
  text "Description" at 194.345,219.632 h1.83
  text "Hole Tolerance (+)" at 216.031,219.632 h1.83
  text "Hole Tolerance (-)" at 249.905,219.632 h1.83
  text "1" at 15.427,215.822 h1.52
  text "2.500mm (98.43mil)" at 30.663,215.822 h1.52
  text "NPTH" at 59.865,215.822 h1.52
  text "Round" at 72.714,215.822 h1.52
  text "Top Layer - Bottom Layer" at 91.353,215.822 h1.52
  text "Pad" at 129.441,215.822 h1.52
  text "Rounded" at 144.423,215.822 h1.52
  text "c0hn250p0" at 163.367,215.822 h1.52
  text "2" at 15.427,212.012 h1.52
  text "0.600mm (23.62mil)" at 30.663,212.012 h1.52
  text "PTH" at 59.865,212.012 h1.52
  text "Slot" at 72.714,212.012 h1.52
  text "Top Layer - Bottom Layer" at 91.353,212.012 h1.52
  text "Pad" at 129.441,212.012 h1.52
  text "Rounded" at 144.423,212.012 h1.52
  text "r90_170h60_140r45" at 163.367,212.012 h1.52
  text "2" at 15.427,208.202 h1.52
  text "0.600mm (23.62mil)" at 30.663,208.202 h1.52
  text "PTH" at 59.865,208.202 h1.52
  text "Slot" at 72.714,208.202 h1.52
  text "Top Layer - Bottom Layer" at 91.353,208.202 h1.52
  text "Pad" at 129.441,208.202 h1.52
  text "Rounded" at 144.423,208.202 h1.52
  text "(Mixed)" at 163.367,208.202 h1.52
  text "2" at 15.427,204.392 h1.52
  text "0.620mm (24.41mil)" at 30.663,204.392 h1.52
  text "NPTH" at 59.865,204.392 h1.52
  text "Round" at 72.714,204.392 h1.52
  text "Top Layer - Bottom Layer" at 91.353,204.392 h1.52
  text "Pad" at 129.441,204.392 h1.52
  text "Rounded" at 144.423,204.392 h1.52
  text "c0hn62" at 163.367,204.392 h1.52
  text "4" at 15.427,200.582 h1.52
  text "1.630mm (64.17mil)" at 30.663,200.582 h1.52
  text "PTH" at 59.865,200.582 h1.52
  text "Round" at 72.714,200.582 h1.52
  text "Top Layer - Bottom Layer" at 91.353,200.582 h1.52
  text "Pad" at 129.441,200.582 h1.52
  text "Rounded" at 144.423,200.582 h1.52
  text "c244h163" at 163.367,200.582 h1.52
  text "4" at 15.427,196.772 h1.52
  text "1.900mm (74.80mil)" at 30.663,196.772 h1.52
  text "PTH" at 59.865,196.772 h1.52
  text "Round" at 72.714,196.772 h1.52
  text "Top Layer - Bottom Layer" at 91.353,196.772 h1.52
  text "Pad" at 129.441,196.772 h1.52
  text "Rounded" at 144.423,196.772 h1.52
  text "c290h190m300mx300p0" at 163.367,196.772 h1.52
  text "4" at 15.427,192.962 h1.52
  text "3.100mm (122.05mil)" at 30.663,192.962 h1.52
  text "PTH" at 59.865,192.962 h1.52
  text "Round" at 72.714,192.962 h1.52
  text "Top Layer - Bottom Layer" at 91.353,192.962 h1.52
  text "Pad" at 129.441,192.962 h1.52
  text "Rounded" at 144.423,192.962 h1.52
  text "c500h310" at 163.367,192.962 h1.52
  text "C" at 1.839,192.709 h1.69
  text "4" at 15.427,189.152 h1.52
  text "3.250mm (127.95mil)" at 30.663,189.152 h1.52
  text "NPTH" at 59.865,189.152 h1.52
  text "Round" at 72.714,189.152 h1.52
  text "Top Layer - Bottom Layer" at 91.353,189.152 h1.52
  text "Pad" at 129.441,189.152 h1.52
  text "Rounded" at 144.423,189.152 h1.52
  text "c0hn325p0" at 163.367,189.152 h1.52
  text "B" at 1.839,188.899 h1.69
  text "4" at 15.427,185.342 h1.52
  text "3.250mm (127.95mil)" at 30.663,185.342 h1.52
  text "NPTH" at 59.865,185.342 h1.52
  text "Round" at 72.714,185.342 h1.52
  text "Top Layer - Bottom Layer" at 91.353,185.342 h1.52
  text "Pad" at 129.441,185.342 h1.52
  text "Rounded" at 144.423,185.342 h1.52
  text "c0hn325" at 163.367,185.342 h1.52
  text "6" at 15.427,181.532 h1.52
  text "1.600mm (62.99mil)" at 30.663,181.532 h1.52
  text "PTH" at 59.865,181.532 h1.52
  text "Round" at 72.714,181.532 h1.52
  text "Top Layer - Bottom Layer" at 91.353,181.532 h1.52
  text "Pad" at 129.441,181.532 h1.52
  text "Rounded" at 144.423,181.532 h1.52
  text "c300h160m310mx310p0" at 163.367,181.532 h1.52
  text "8" at 15.427,177.722 h1.52
  text "0.950mm (37.40mil)" at 30.663,177.722 h1.52
  text "PTH" at 59.865,177.722 h1.52
  text "Round" at 72.714,177.722 h1.52
  text "Top Layer - Bottom Layer" at 91.353,177.722 h1.52
  text "Pad" at 129.441,177.722 h1.52
  text "(Mixed)" at 144.423,177.722 h1.52
  text "(Mixed)" at 163.367,177.722 h1.52
  text "8" at 15.427,173.912 h1.52
  text "1.000mm (39.37mil)" at 30.663,173.912 h1.52
  text "PTH" at 59.865,173.912 h1.52
  text "Round" at 72.714,173.912 h1.52
  text "Top Layer - Bottom Layer" at 91.353,173.912 h1.52
  text "Pad" at 129.441,173.912 h1.52
  text "(Mixed)" at 144.423,173.912 h1.52
  text "(Mixed)" at 163.367,173.912 h1.52
  text "8" at 15.427,170.102 h1.52
  text "1.020mm (40.16mil)" at 30.663,170.102 h1.52
  text "PTH" at 59.865,170.102 h1.52
  text "Round" at 72.714,170.102 h1.52
  text "Top Layer - Bottom Layer" at 91.353,170.102 h1.52
  text "Pad" at 129.441,170.102 h1.52
  text "Rounded" at 144.423,170.102 h1.52
  text "c153h102" at 163.367,170.102 h1.52
  text "8" at 15.427,166.292 h1.52
  text "1.500mm (59.06mil)" at 30.663,166.292 h1.52
  text "PTH" at 59.865,166.292 h1.52
  text "Round" at 72.714,166.292 h1.52
  text "Top Layer - Bottom Layer" at 91.353,166.292 h1.52
  text "Pad" at 129.441,166.292 h1.52
  text "(Mixed)" at 144.423,166.292 h1.52
  text "(Mixed)" at 163.367,166.292 h1.52
  text "13" at 15.427,162.482 h1.52
  text "0.900mm (35.43mil)" at 30.663,162.482 h1.52
  text "PTH" at 59.865,162.482 h1.52
  text "Round" at 72.714,162.482 h1.52
  text "Top Layer - Bottom Layer" at 91.353,162.482 h1.52
  text "Pad" at 129.441,162.482 h1.52
  text "(Mixed)" at 144.423,162.482 h1.52
  text "(Mixed)" at 163.367,162.482 h1.52
  text "16" at 15.427,158.672 h1.52
  text "0.890mm (35.04mil)" at 30.663,158.672 h1.52
  text "PTH" at 59.865,158.672 h1.52
  text "Round" at 72.714,158.672 h1.52
  text "Top Layer - Bottom Layer" at 91.353,158.672 h1.52
  text "Pad" at 129.441,158.672 h1.52
  text "(Mixed)" at 144.423,158.672 h1.52
  text "(Mixed)" at 163.367,158.672 h1.52
  text "16" at 15.427,154.862 h1.52
  text "0.900mm (35.43mil)" at 30.663,154.862 h1.52
  text "PTH" at 59.865,154.862 h1.52
  text "Round" at 72.714,154.862 h1.52
  text "Top Layer - Bottom Layer" at 91.353,154.862 h1.52
  text "Pad" at 129.441,154.862 h1.52
  text "Rounded" at 144.423,154.862 h1.52
  text "c150h90m160mx160p0" at 163.367,154.862 h1.52
  text "A" at 1.839,154.609 h1.69
  text "20" at 15.427,151.052 h1.52
  text "1.400mm (55.12mil)" at 30.663,151.052 h1.52
  text "PTH" at 59.865,151.052 h1.52
  text "Round" at 72.714,151.052 h1.52
  text "Top Layer - Bottom Layer" at 91.353,151.052 h1.52
  text "Pad" at 129.441,151.052 h1.52
  text "Rounded" at 144.423,151.052 h1.52
  text "c250h140m260mx260p0" at 163.367,151.052 h1.52
  text "F" at 1.839,150.799 h1.69
  text "22" at 15.427,147.242 h1.52
  text "1.300mm (51.18mil)" at 30.663,147.242 h1.52
  text "PTH" at 59.865,147.242 h1.52
  text "Round" at 72.714,147.242 h1.52
  text "Top Layer - Bottom Layer" at 91.353,147.242 h1.52
  text "Pad" at 129.441,147.242 h1.52
  text "Rounded" at 144.423,147.242 h1.52
  text "(Mixed)" at 163.367,147.242 h1.52
  text "534" at 15.427,143.432 h1.52
  text "0.300mm (11.81mil)" at 30.663,143.432 h1.52
  text "PTH" at 59.865,143.432 h1.52
  text "Round" at 72.714,143.432 h1.52
  text "Top Layer - Bottom Layer" at 91.353,143.432 h1.52
  text "Via" at 129.441,143.432 h1.52
  text "Rounded" at 144.423,143.432 h1.52
  text "v60h30" at 163.367,143.432 h1.52
  text "D" at 1.839,143.179 h1.69
  text "686 Total" at 15.427,139.622 h1.52
  text "Slot definitions :" at 2.578,135.94 h1.52
  text "Routed Path Length" at 28.808,135.94 h1.52
  text "= Calculated from tool start centre position to tool end centre position." at 56.816,135.94 h1.52
  text "Hole Length" at 28.808,133.401 h1.52
  text "= Routed Path Length + Tool Size = Slot length as defined in the PCB layout" at 46.406,133.401 h1.52

## Text inside footprints (layer, text, board x,y; h text height)
J4: Mechanical 13 "PCB Edge" at 149.414,77.248 h0.8 r90
J7: Top Overlay "1" at 2.54,52.368 h0.8 r90
J12: Top Overlay "1" at 72.342,109.571 h1 r180
J13: Top Overlay "1" at 50.93,109.571 h1 r180
K1: Top Overlay "1" at 33.02,32.277 h0.8 r180
K2: Top Overlay "1" at 69.3,32.269 h0.8 r180
K3: Top Overlay "1" at 105.596,32.269 h0.8 r180
K4: Top Overlay "1" at 141.897,32.277 h0.8 r180
SW2: Top Overlay "3" at 55.27,65.874 h0.9 r180; Top Overlay "2" at 52.781,65.848 h0.9 r180; Top Overlay "1" at 50.267,65.823 h0.9 r180; Top Overlay "ON" at 49.454,69.666 h0.76